# Altium PCB PCB.PcbDoc
Units mm, origin at the board's own origin, x right, y up, seen from the top; angles counter-clockwise.
Board outline 33 x 33 mm, 2 copper layers (Top Layer, Bottom Layer), stack 1.536 mm thick; 34 components, 18 nets, 78 pads, 284 vias.
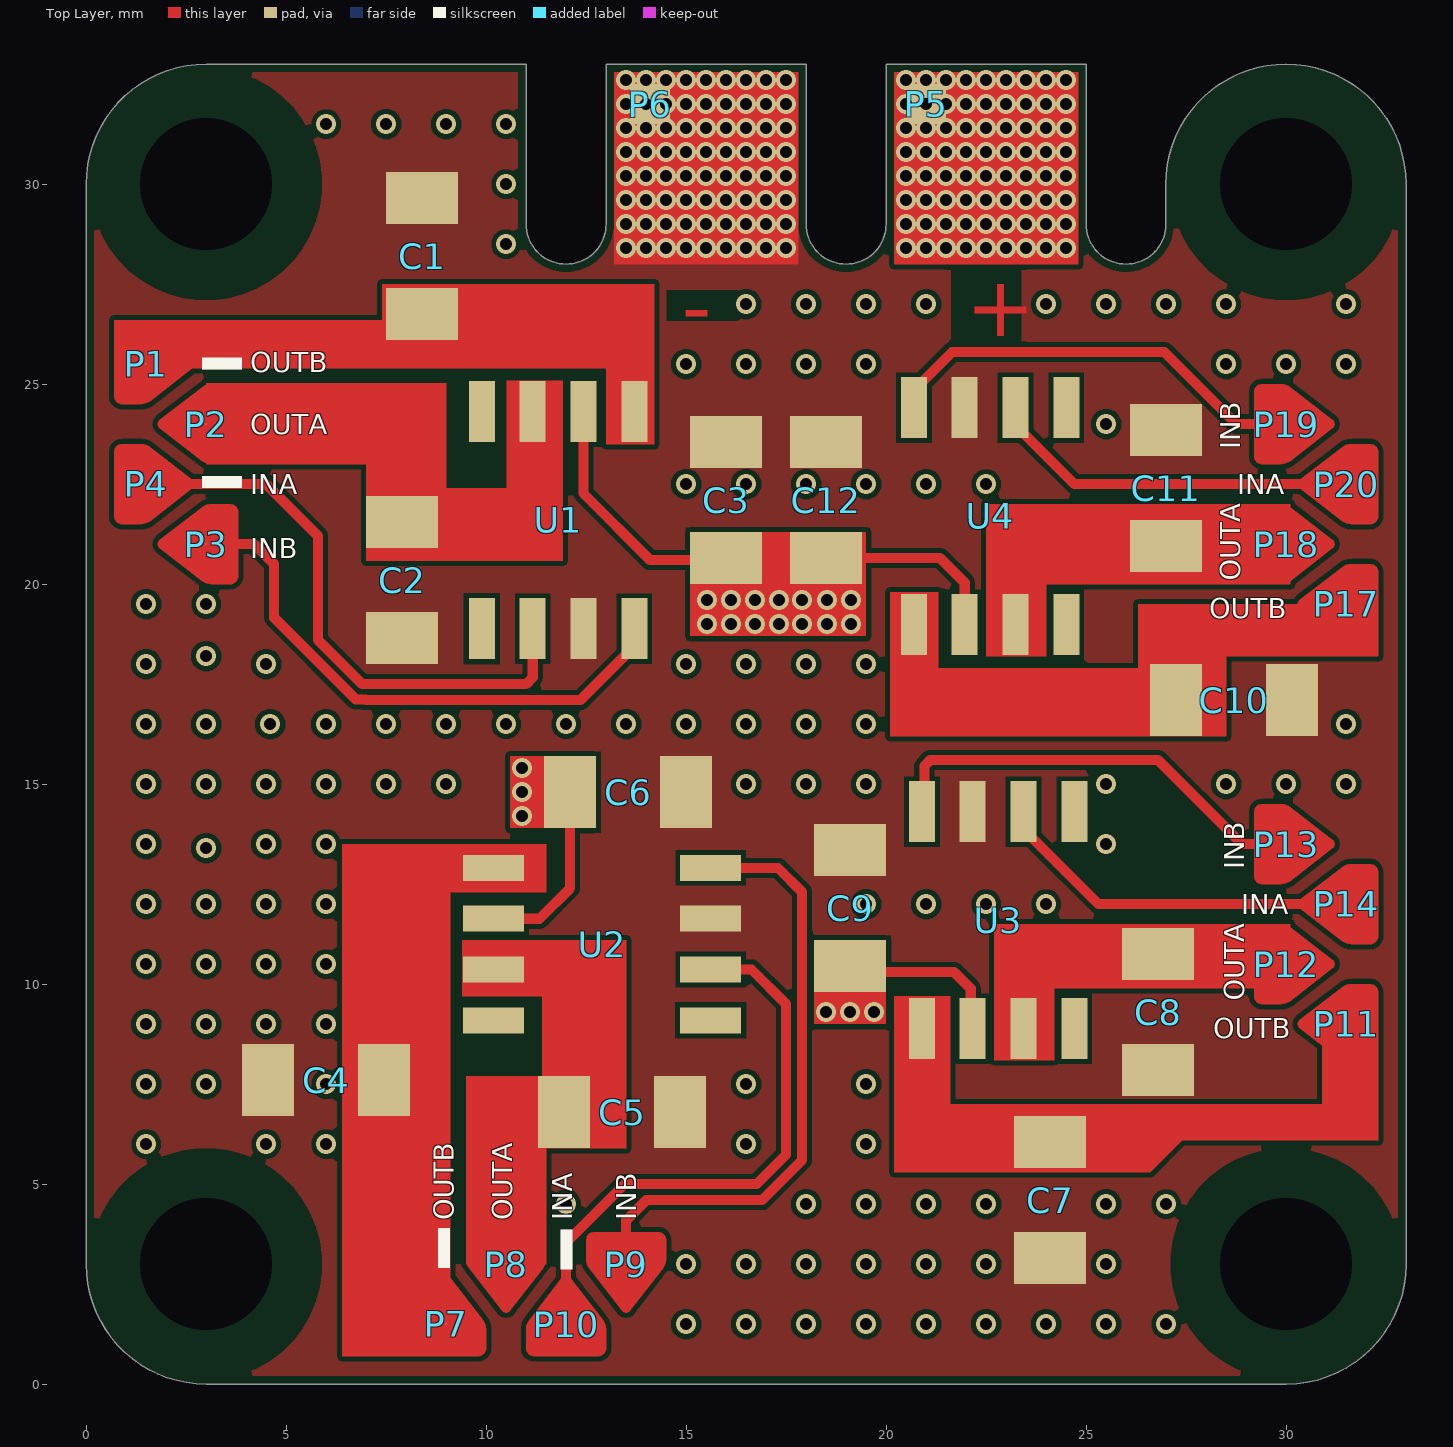
[diagram p0: Top Layer view]
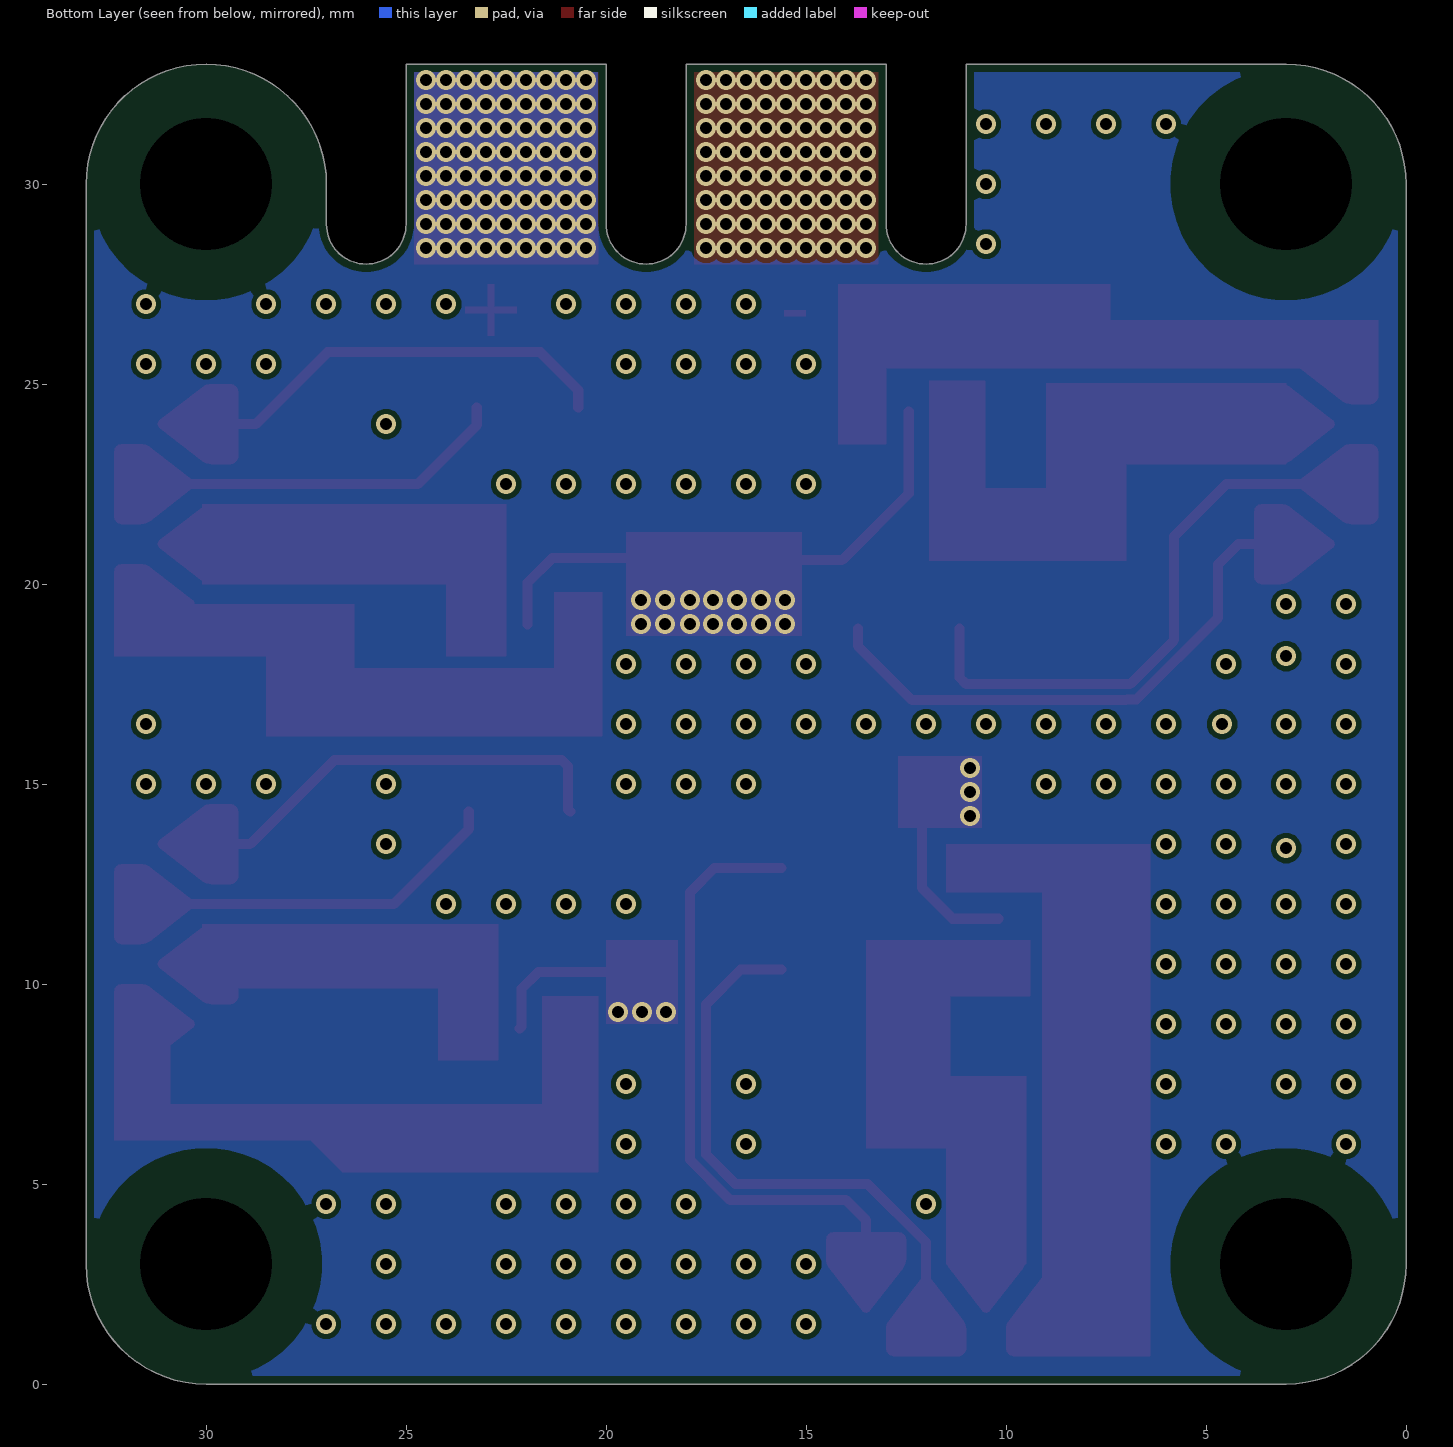
[diagram p1: Bottom Layer view, seen from below]
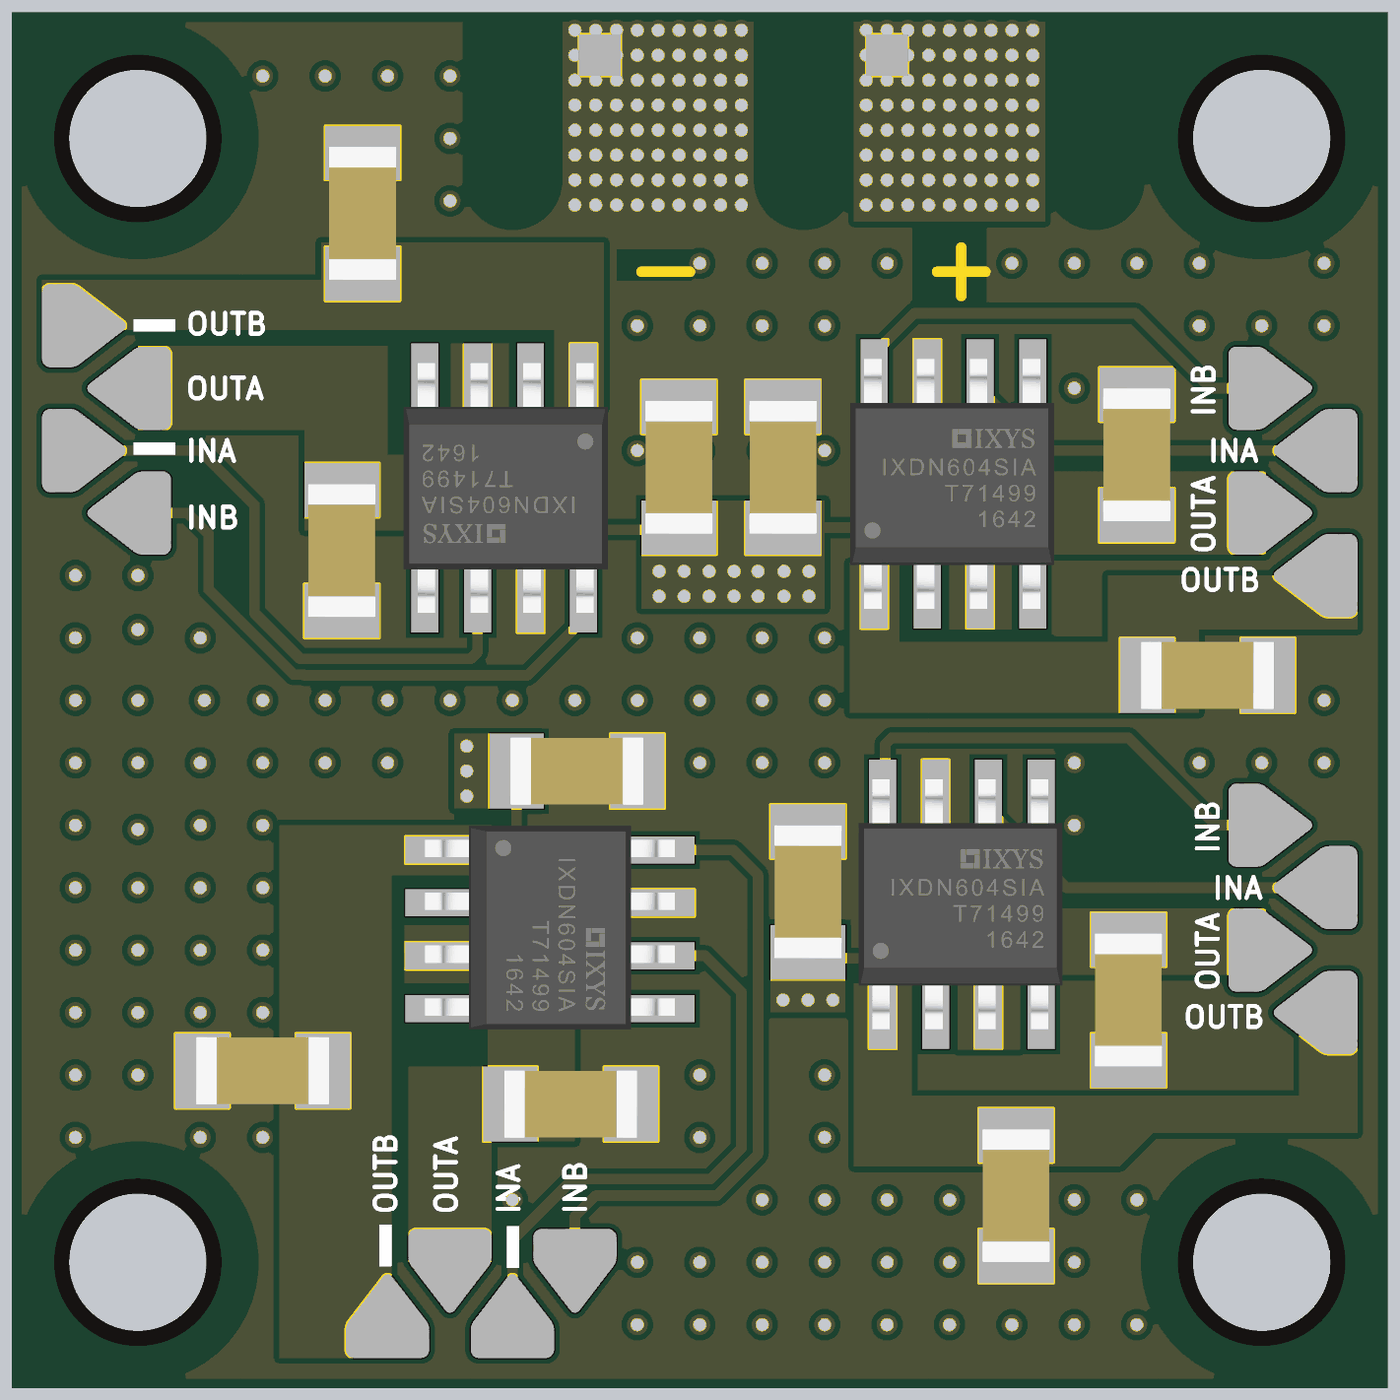
[diagram p2: 3D render of the assembled board from above, using the file's embedded part models]

## Layer stack, top to bottom
Top Solder: solder mask 0.0102, Solder Resist, Dk 3.5
Top Layer: signal copper 0.0356
Dielectric 1: dielectric 1.465, FR-4, Dk 4.8
Bottom Layer: signal copper 0.0356
Bottom Solder: solder mask 0.0102, Solder Resist, Dk 3.5

## Board outline
3,0 30,0 ccw(c30,3) 33,3 33,30 ccw(c30,30) 30,33 ccw(c30,29.991) 26.991,29.991 26.991,28.991 cw(c26,28.991) 26,28 cw(c26,29) 25,29 25,33 20,33 20,29 cw(c19,29) 19,28 cw(c19,29) 18,29 18,33 13,33 13,29 cw(c12,29) 12,28 cw(c12,29) 11,29 11,33 3,33 ccw(c3,30) 0,30 0,3 ccw(c3,3)

## Design rules (kind name [scope] priority, off if disabled: settings)
BoardOutlineClearance [All] p1: gap=0.2 ignorepadtopadclearanceinfootprint=FALSE
Clearance [All] p1: gap=0.127 ignorepadtopadclearanceinfootprint=FALSE
ComponentClearance [All] p1 off: gap=0.254 collisioncheckmode=3 verticalgap=0 showdistances=FALSE checkcomponentboundary=TRUE
DiffPairsRouting [All] p1: maxlimit=0.3 minlimit=0.3 mostfreqgap=0.3 toplayer_minwidth=0.2 toplayer_maxwidth=0.2 toplayer_prefwidth=0.2 bottomlayer_minwidth=0.2 bottomlayer_maxwidth=0.2 bottomlayer_prefwidth=0.2 maxuncoupledlength=12.7
PlaneConnect [All] p1: planeconnectstyle=Direct reliefexpansion=0.508 reliefentries=4 reliefconductorwidth=0.254 reliefairgap=0.254
PolygonConnect [All] p1: connectstyle=Direct reliefconductorwidth=0.254 reliefentries=4 polygonreliefangle="90 Angle" airgapwidth=0.254
RoutingVias [All] p1: holewidth=0.3 width=0.5 viastyle="Through Hole" minholewidth=0.3 minwidth=0.5 maxholewidth=0.711 maxwidth=1.27
ShortCircuit [InComponent('*1')or InComponent('*2') or InComponent('*3') vs InComponent('*1')or InComponent('*2') or InComponent('*3')] p1: allowed=TRUE
SilkToSilkClearance [All] p1 off: silktosilkclearance=0.254
SolderMaskExpansion [All] p1: expansion=0.035 istentingtop=FALSE
Width [All] p1: maxlimit=2 minlimit=0.127 preferedwidth=0.2
25 further rules are at their usual default settings.

## Components (designator, comment, footprint, x,y, rotation, side; value= is the part's Value field where it differs from the comment)
C1 "1206, 10uF" "CAP 1206_3216" 8.4,28.2 r270 top
C2 "1206, 10uF" "CAP 1206_3216" 7.9,20.1 r90 top
C3 "1206, 10uF" "CAP 1206_3216" 16,22.1 r270 top
C4 "1206, 10uF" "CAP 1206_3216" 6,7.6 r0 top
C5 "1206, 10uF" "CAP 1206_3216" 13.4,6.8 r180 top
C6 "1206, 10uF" "CAP 1206_3216" 13.55,14.8 r180 top
C7 "1206, 10uF" "CAP 1206_3216" 24.1,4.6 r90 top
C8 "1206, 10uF" "CAP 1206_3216" 26.8,9.3 r90 top
C9 "1206, 10uF" "CAP 1206_3216" 19.1,11.9 r270 top
C10 "1206, 10uF" "CAP 1206_3216" 28.7,17.1 r180 top
C11 "1206, 10uF" "CAP 1206_3216" 27,22.4 r270 top
C12 "1206, 10uF" "CAP 1206_3216" 18.5,22.1 r270 top
P1 "Pad0" PAD#1 1.5,25.5 r270 top
P2 "Pad0" PAD#1 3,24 r90 top
P3 "Pad0" PAD#1 3,21 r90 top
P4 "Pad1" PAD#1 1.5,22.5 r270 top
P5 "Pad0" PAD#2 21,32 r90 top
P6 "Pad1" PAD#2 14.1,32 r270 top
P7 "Pad0" PAD#1 9,1.5 r0 top
P8 "Pad0" PAD#1 10.5,3 r180 top
P9 "Pad0" PAD#1 13.5,3 r180 top
P10 "Pad1" PAD#1 12,1.5 r0 top
P11 "Pad0" PAD#1 31.5,9 r90 top
P12 "Pad0" PAD#1 30,10.5 r270 top
P13 "Pad0" PAD#1 30,13.5 r270 top
P14 "Pad1" PAD#1 31.5,12 r90 top
P17 "Pad0" PAD#1 31.5,19.5 r90 top
P18 "Pad0" PAD#1 30,21 r270 top
P19 "Pad0" PAD#1 30,24 r270 top
P20 "Pad1" PAD#1 31.5,22.5 r90 top
U1 "IXDN604SIA" SOIC127P600X175-8N 11.8,21.6 r90 top
U2 "IXDN604SIA" SOIC127P600X175-8N 12.9,11 r180 top
U3 "IXDN604SIA" SOIC127P600X175-8N 22.8,11.6 r270 top
U4 "IXDN604SIA" SOIC127P600X175-8N 22.6,21.7 r270 top

## Footprints (in the part's own frame and the unit in brackets; to place one, negate y for a bottom-side part, rotate by r counter-clockwise, add the part's x,y. Pads: shape width x height; smd on the part's side, far side on the other; paste and mask are expansions set on the pad)
"CAP 1206_3216" [mm] "Chip Capacitor, 2-Leads, Body 3.25x1.60mm, IPC Medium Density"
  rect 1.3x1.8 smd: 1(-1.45,0) 2(1.45,0)
  body extent -1.6,-0.81 1.6,0.81, height 1.62
PAD#1 [mil]
  round 1 smd: 1(0,0)
  Top Layer region: -39.37,-23.78 -39.37,-4.87 -38.61,-0.26 -36.4,3.86 -36.4,3.86 -4.29,45.6 -2.39,47.16 0,47.71 2.39,47.16 4.29,45.6 4.29,45.6 36.32,3.97 38.59,-0.27 39.37,-5.01 39.37,-5.01 39.37,-23.64 38.77,-26.65 37.07,-29.2 34.52,-30.9 31.52,-31.5 31.52,-31.5 -31.66,-31.5 -34.61,-30.91 -37.11,-29.24 -38.78,-26.73 -39.37,-23.78
PAD#2 [mil]
  rect 39.37x39.37 smd: 1(0,0)
SOIC127P600X175-8N [mm]
  rect 1.525x0.65 smd: 1(-2.712,1.905) 2(-2.712,0.635) 3(-2.712,-0.635) 4(-2.712,-1.905) 5(2.712,-1.905) 6(2.712,-0.635) 7(2.712,0.635) 8(2.712,1.905)
  body extent -3,-2.49 3,2.41, height 1.76

## Part data
C1 C2 C3 C4 C5 C6 C7 C8 C9 C10 C11 C12: library part "1206 Kapasitör"

## Free pads (board coordinates)
  round 1.524 hole 3.3 unplated mask+1.25: ""(3,3) ""(3,30) ""(30,3) ""(30,30)

## Via types
v1: diameter 0.5, hole 0.3, Top Layer to Bottom Layer, tented both sides, 284 vias

## Nets (pads, with @x,y where several pads share a name; then routed paths per layer and width w, separated by ;. In a path a pad name is that pad's centre, name@x,y a point inside that pad or via, vN(x,y) a via of type N, cw(c..) or ccw(c..) an arc to the next point about the centre after c; other vN are vias at no path point)
GND: C1.1 C2.1 C3.1 C4.1 C5.1 C6.1 C7.1 C8.1 C9.1 C10.1 C11.1 C12.1 P6.1 U1.3 U2.3 U3.3 U4.3
  other v1: 13.5,28.4 14,28.4 14.5,28.4 15,28.4 15.5,28.4 16,28.4 16.5,28.4 17,28.4 17.5,28.4 13.5,29 14,29 14.5,29 15,29 15.5,29 16,29 16.5,29 17,29 17.5,29 13.5,29.6 14,29.6 14.5,29.6 15,29.6 15.5,29.6 16,29.6 16.5,29.6 17,29.6 17.5,29.6 13.5,30.2 14,30.2 14.5,30.2 15,30.2 15.5,30.2 16,30.2 16.5,30.2 17,30.2 17.5,30.2 13.5,30.8 14,30.8 14.5,30.8 15,30.8 15.5,30.8 16,30.8 16.5,30.8 17,30.8 17.5,30.8 13.5,31.4 14,31.4 14.5,31.4 15,31.4 15.5,31.4 16,31.4 16.5,31.4 17,31.4 17.5,31.4 13.5,32 14,32 14.5,32 15,32 15.5,32 16,32 16.5,32 17,32 17.5,32 13.5,32.6 14,32.6 14.5,32.6 15,32.6 15.5,32.6 16,32.6 16.5,32.6 17,32.6 17.5,32.6
NetC1_2: C1.2 P1.1 U1.5 | length 0.1
  Top Layer w0.254: C1.2@8.35,26.8 C1.2
NetC2_2: C2.2 P2.1 U1.7 | length 0.1
  Top Layer w0.254: C2.2@7.85,21.5 C2.2
NetC4_2: C4.2 P7.1 U2.5
NetC5_2: C5.2 P8.1 U2.7
NetC7_2: C7.2 P11.1 U3.5
NetC8_2: C8.2 P12.1 U3.7 | length 0.1
  Top Layer w0.254: C8.2@26.45,10.8 C8.2@26.5,10.75
NetC10_2: C10.2 P17.1 U4.5 | length 0.4
  Top Layer w0.254: U4.5 U4.5@20.807,18.876 ; C10.2 C10.2@27.25,17.35
NetC11_2: C11.2 P18.1 U4.7 | length 0.1
  Top Layer w0.254: C11.2 C11.2@27.05,21
NetP3_1: P3.1 U1.4 | length 14.1
  Top Layer w0.254: P3.1 4.2,21 4.7,20.5 4.7,19.161 6.742,17.119 6.981,17.119 7,17.1 12.354,17.1 13.705,18.45 U1.4
NetP4_1: P4.1 U1.2 | length 14.6
  Top Layer w0.254: P4.1 4.5,22.5 5.8,21.2 5.8,18.6 6.9,17.5 11,17.5 11.165,17.665 U1.2
NetP9_1: P9.1 U2.4 | length 15.4
  Top Layer w0.254: P9.1 13.5,4.1 14,4.6 16.898,4.6 17.9,5.602 17.9,12.3 17.295,12.905 U2.4
NetP10_1: P10.1 U2.2 | length 14.5
  Top Layer w0.254: P10.1 12,3.542 13.458,5 16.759,5 17.5,5.741 17.5,9.5 16.635,10.365 U2.2
NetP13_1: P13.1 U3.4 | length 11.1
  Top Layer w0.254: U3.4 20.956,14.373 20.956,15.451 21.104,15.6 26.8,15.6 28.9,13.5 P13.1
NetP14_1: P14.1 U3.2 | length 9.3
  Top Layer w0.254: U3.2 23.435,13.875 25.31,12 P14.1
NetP19_1: P19.1 U4.4 | length 10.9
  Top Layer w0.254: U4.4 20.695,24.85 21.645,25.8 26.959,25.8 28.759,24 P19.1
NetP20_1: P20.1 U4.2 | length 9.3
  Top Layer w0.254: U4.2 23.235,23.975 24.71,22.5 P20.1
VCC: C3.2 C6.2 C9.2 C12.2 P5.1 U1.6 U2.6 U3.6 U4.6 | length 20
  Top Layer w0.254: U2.6 11.335,11.635 12.1,12.4 C6.2 ; U1.6 12.435,22.265 14.1,20.6 15.95,20.6 C3.2 ; C12.2 21.35,20.65 21.965,20.035 U4.6 ; C9.2 19.25,10.3 21.7,10.3 22.117,9.883 22.117,8.936 U3.6
  other v1: 18.5,9.3 19.1,9.3 19.7,9.3 10.9,14.2 10.9,14.8 10.9,15.4 15.525,19 16.125,19 16.725,19 17.325,19 17.9,19 18.525,19 19.125,19 15.525,19.6 16.125,19.6 16.725,19.6 17.325,19.6 17.9,19.6 18.525,19.6 19.125,19.6 20.5,28.4 21,28.4 21.5,28.4 22,28.4 22.5,28.4 23,28.4 23.5,28.4 24,28.4 24.5,28.4 20.5,29 21,29 21.5,29 22,29 22.5,29 23,29 23.5,29 24,29 24.5,29 20.5,29.6 21,29.6 21.5,29.6 22,29.6 22.5,29.6 23,29.6 23.5,29.6 24,29.6 24.5,29.6 20.5,30.2 21,30.2 21.5,30.2 22,30.2 22.5,30.2 23,30.2 23.5,30.2 24,30.2 24.5,30.2 20.5,30.8 21,30.8 21.5,30.8 22,30.8 22.5,30.8 23,30.8 23.5,30.8 24,30.8 24.5,30.8 20.5,31.4 21,31.4 21.5,31.4 22,31.4 22.5,31.4 23,31.4 23.5,31.4 24,31.4 24.5,31.4 20.5,32 21,32 21.5,32 22,32 22.5,32 23,32 23.5,32 24,32 24.5,32 20.5,32.6 21,32.6 21.5,32.6 22,32.6 22.5,32.6 23,32.6 23.5,32.6 24,32.6 24.5,32.6
pads on no net: U1.1 U1.8 U2.1 U2.8 U3.1 U3.8 U4.1 U4.8
copper on no net:
  other v1: 15,1.5 16.5,1.5 18,1.5 19.5,1.5 21,1.5 22.5,1.5 24,1.5 25.5,1.5 27,1.5 15,3 16.5,3 18,3 19.5,3 21,3 22.5,3 25.5,3 12,4.5 18,4.5 19.5,4.5 19.5,4.5 21,4.5 22.5,4.5 25.5,4.5 27,4.5 1.5,6 4.5,6 6,6 16.5,6 19.5,6 1.5,7.5 3,7.5 6,7.5 16.5,7.5 19.5,7.5 1.5,9 3,9 4.5,9 6,9 1.5,10.5 3,10.5 4.5,10.5 6,10.5 1.5,12 3,12 4.5,12 6,12 19.5,12 21,12 22.5,12 24,12 3,13.4 1.5,13.5 4.5,13.5 6,13.5 25.5,13.5 1.5,15 3,15 4.5,15 6,15 7.5,15 9,15 16.5,15 18,15 19.5,15 25.5,15 28.5,15 30,15 31.5,15 1.5,16.5 3,16.5 4.6,16.5 6,16.5 7.5,16.5 9,16.5 10.5,16.5 12,16.5 13.5,16.5 15,16.5 16.5,16.5 18,16.5 19.5,16.5 31.5,16.5 1.5,18 4.5,18 15,18 16.5,18 18,18 19.5,18 3,18.2 1.5,19.5 3,19.5 15,22.5 16.5,22.5 18,22.5 19.5,22.5 21,22.5 22.5,22.5 25.5,24 15,25.5 16.5,25.5 18,25.5 19.5,25.5 28.5,25.5 30,25.5 31.5,25.5 16.5,27 18,27 19.5,27 21,27 24,27 25.5,27 27,27 28.5,27 31.5,27 10.5,28.5 10.5,30 6,31.5 7.5,31.5 9,31.5 10.5,31.5

## Polygon pours and split planes (outlines as drawn)
VCC on Bottom Layer "VCC_L02_P000" (solid, remove dead copper, pour order 0): 0,0 0,33.1 33,33.1 33,0.1
GND on Top Layer "GND_L01_P001" (solid, remove dead copper, pour order 1): 0,0 0,33.1 33,33.1 33,0.1

## Other copper
Top Layer:
  region net VCC: 10.6,15.7 10.6,13.9 12.7,13.9 12.7,15.7
  rectangle net VCC: 18.2,9 20,11.1
  rectangle net VCC: 15.1,18.7 19.5,21.3
  region net NetC8_2: 30.1,11.5 30.1,9.9 24.2,9.9 24.2,8.1 22.7,8.1 22.7,11.5
  region net NetC1_2: 14.2,23.5 14.2,27.5 7.4,27.5 7.4,26.6 0.7,26.6 0.7,25.4 13,25.4 13,23.5
  region net NetC5_2: 9.5,3 9.5,7.7 11.4,7.7 11.4,9.7 9.4,9.7 9.4,11.1 13.5,11.1 13.5,5.9 11.5,5.9 11.5,3
  region net NetC4_2: 9.1,0.7 9.1,12.294 11.5,12.294 11.5,13.5 6.4,13.5 6.4,0.7
  region net NetC7_2: 32.3,9.3 32.3,6.1 27.4,6.1 26.6,5.3 20.2,5.3 20.2,9.7 21.6,9.7 21.6,7 30.9,7 30.9,9.3
  region net NetC10_2: 32.3,19.5 32.3,18.2 28.5,18.2 28.5,16.2 26.3,16.2 20.1,16.2 20.1,19.8 21.3,19.8 21.3,17.9 26.3,17.9 26.3,19.5
  region net NetC11_2: 30.1,22 30.1,20 24,20 24,18.2 22.5,18.2 22.5,22
  region net NetC2_2: 11.919,25.081 11.919,20.581 7,20.58 7,23 3,23 3,25.021 9,25.021 9,22.4 10.519,22.4 10.519,25.081
  region net GND: 13.2,28 13.2,32.8 17.8,32.8 17.8,28
  region net VCC: 20.2,28 20.2,32.8 24.8,32.8 24.8,28
  text "-" at 14.892,26.2 h1.52
  text "+" at 21.992,26.2 h1.52
Multi-Layer:
  pour cut-out: 3,0.1 cw(c3,3) 0.1,3 cw(c3,3) 3,5.9 cw(c3,3) 5.9,3 cw(c3,3)
  pour cut-out: 30,0.1 cw(c30,3) 27.1,3 cw(c30,3) 30,5.9 cw(c30,3) 32.9,3 cw(c30,3)
  pour cut-out: 30,27.1 cw(c30,30) 27.1,30 cw(c30,30) 30,32.9 cw(c30,30) 32.9,30 cw(c30,30)
  pour cut-out: 3,27.1 cw(c3,30) 0.1,30 cw(c3,30) 3,32.9 cw(c3,30) 5.9,30 cw(c3,30)

## Silkscreen, mask and mechanical layers (free items; w line width, h text height)
Top Overlay:
  region: 12.164,2.865 12.164,3.865 11.864,3.865 11.864,2.865
  region: 9.1,2.9 9.1,3.9 8.8,3.9 8.8,2.9
  rectangle: 2.9,22.4 3.9,22.7
  rectangle: 2.898,25.362 3.898,25.662
  text "OUTB" at 4.104,25.303 h0.5
  text "OUTA" at 4.1,23.75 h0.5
  text "INB" at 28.85,23.375 h0.5 r90
  text "INA" at 4.1,22.25 h0.5
  text "INA" at 28.775,22.25 h0.5
  text "INB" at 4.1,20.65 h0.5
  text "OUTA" at 28.85,20.084 h0.5 r90
  text "OUTB" at 28.084,19.15 h0.5
  text "INB" at 28.95,12.875 h0.5 r90
  text "INA" at 28.875,11.75 h0.5
  text "OUTA" at 28.95,9.584 h0.5 r90
  text "OUTB" at 28.184,8.65 h0.5
  text "OUTB" at 9.194,4.102 h0.5 r90
  text "OUTA" at 10.65,4.1 h0.5 r90
  text "INA" at 12.15,4.1 h0.5 r90
  text "INB" at 13.75,4.1 h0.5 r90
Top Solder:
  text "-" at 14.892,26.2 h1.52
  text "+" at 21.992,26.2 h1.52